# Altium PCB Business_Idea_PCB.PcbDoc
Units mm, origin at the board's own origin, x right, y up, seen from the top; angles counter-clockwise.
Board outline 28 x 44.5 mm, 2 copper layers (Top Layer, Bottom Layer), stack 1.6 mm thick; 51 components, 40 nets, 254 pads, 70 vias.
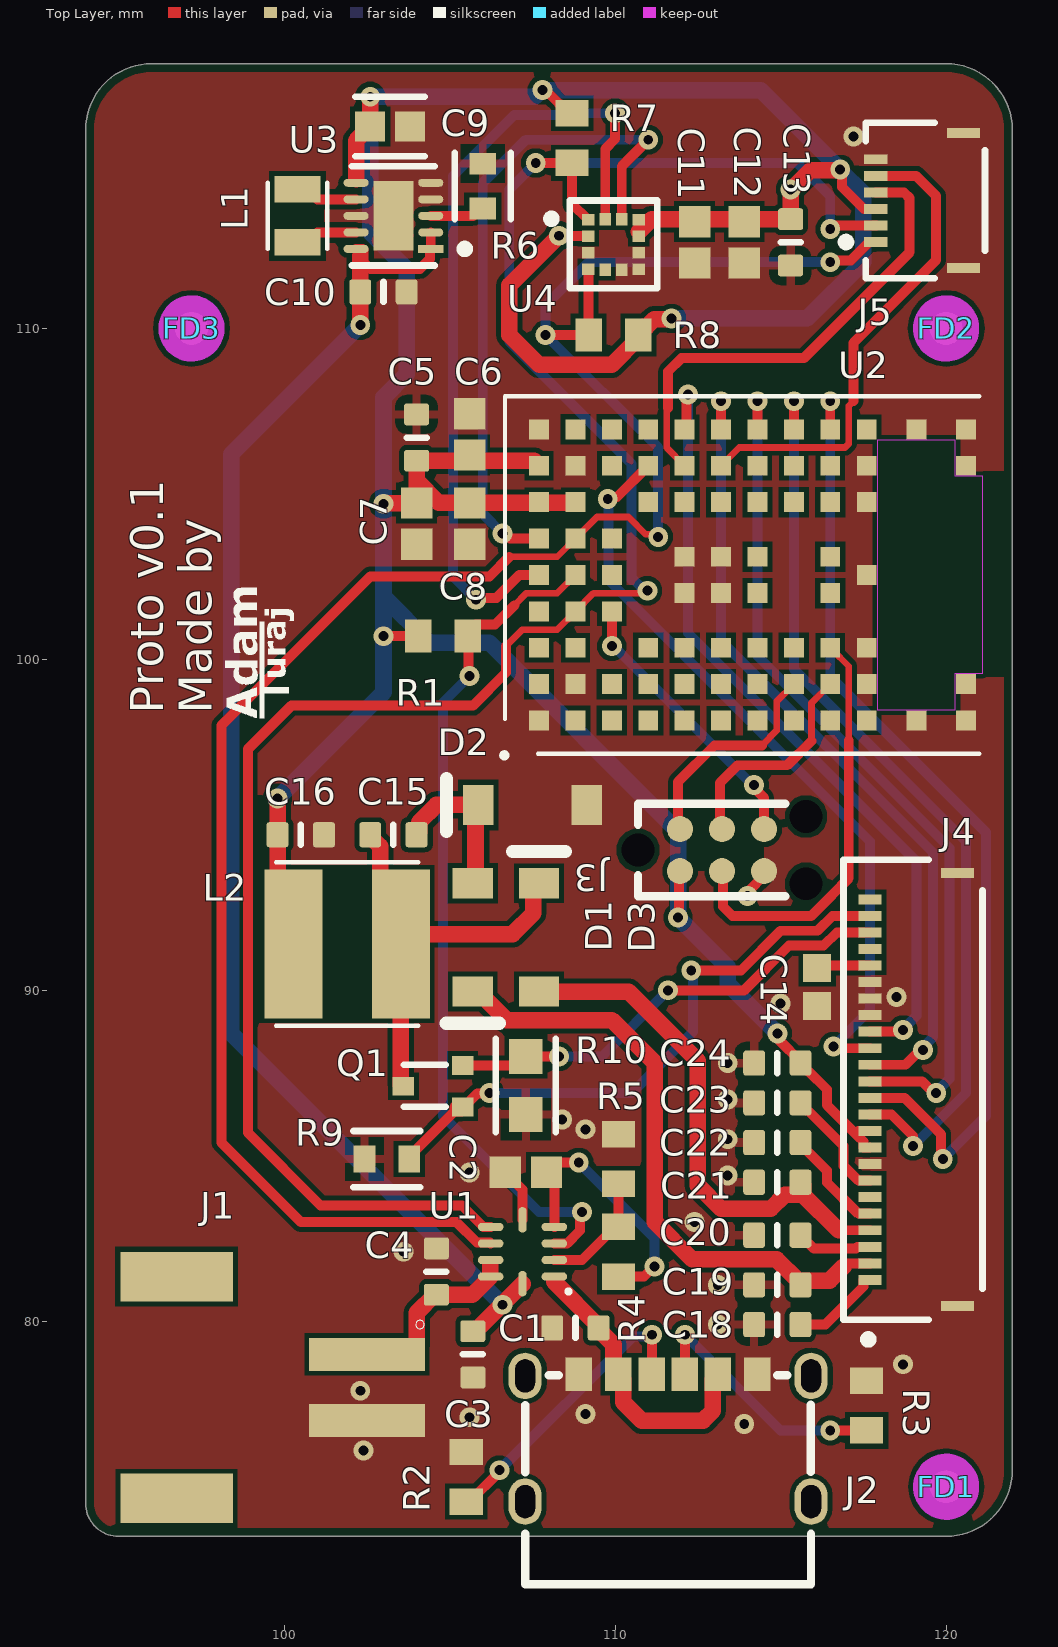
[diagram p0: Top Layer view]
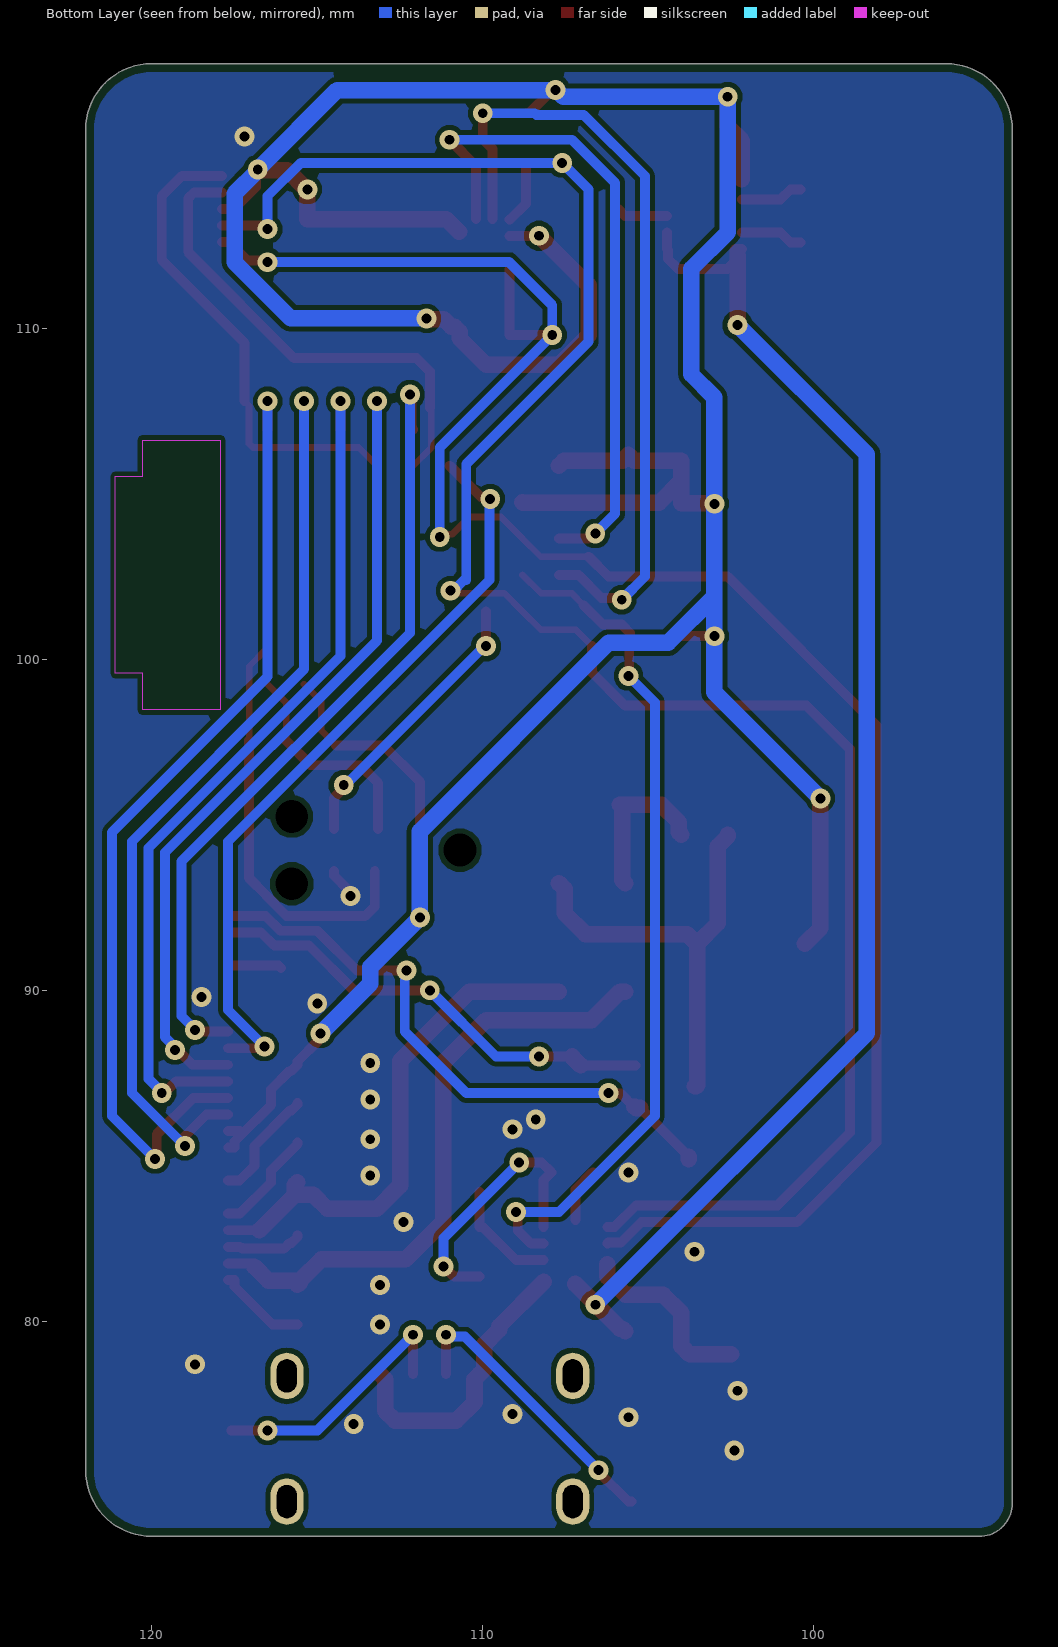
[diagram p1: Bottom Layer view, seen from below]
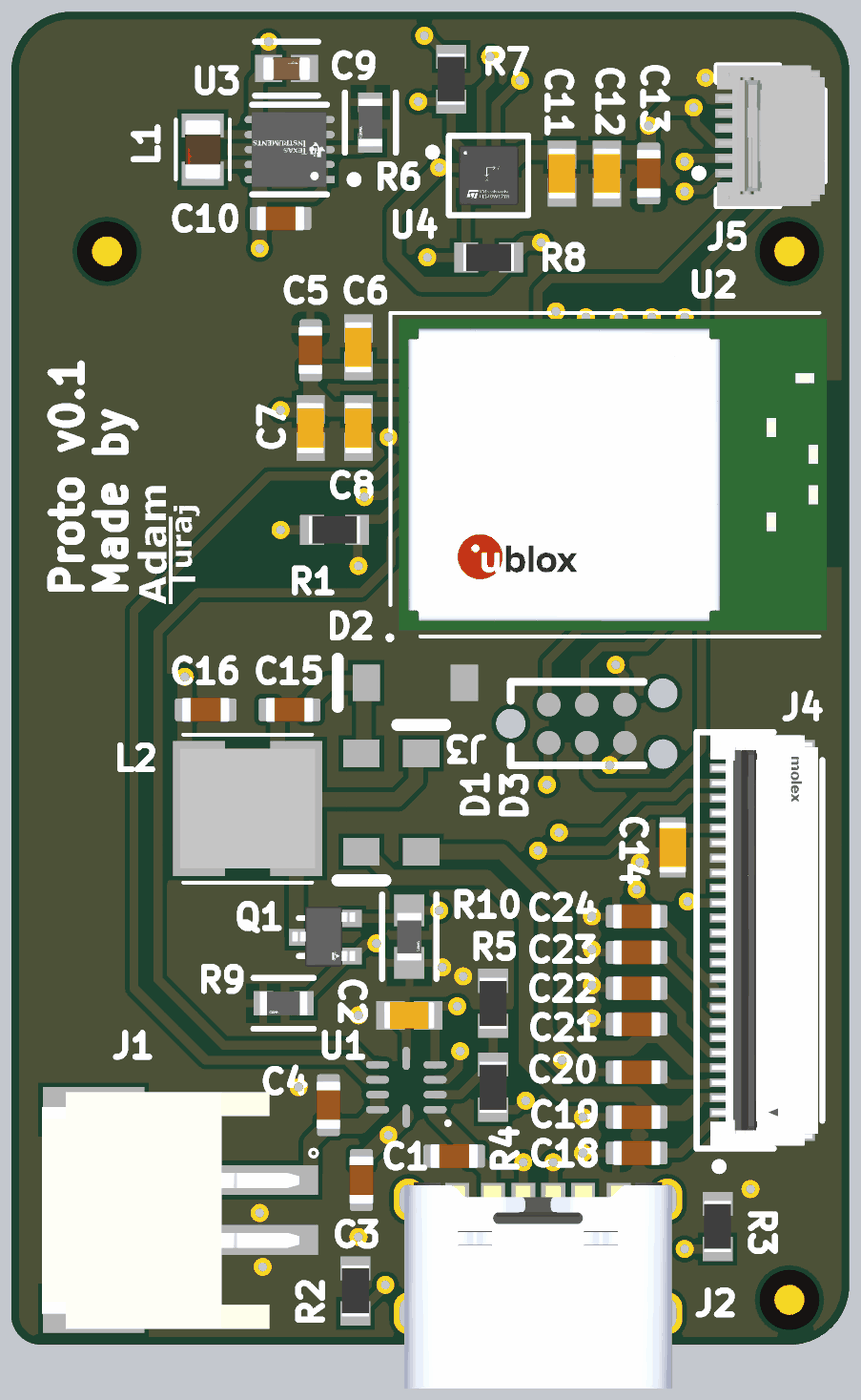
[diagram p2: 3D render of the assembled board from above, using the file's embedded part models]

## Layer stack, top to bottom
Top Solder: solder mask 0.0102, Solder Resist, Dk 3.5
Top Layer: signal copper 0.035
Dielectric 1: prepreg 1.53, PP-006, Dk 4.1
Bottom Layer: signal copper 0.035
Bottom Solder: solder mask 0.0102, Solder Resist, Dk 3.5

## Board outline
94,74.5 ccw(c95,74.5) 95,73.5 120,73.5 ccw(c120,75.5) 122,75.5 122,116 ccw(c120,116) 120,118 96,118 ccw(c96,116) 94,116

## Design rules (kind name [scope] priority, off if disabled: settings)
BoardOutlineClearance [All] p1: gap=0.254 ignorepadtopadclearanceinfootprint=FALSE except(0: Arc-SplitContinuation Track-SplitContinuation SMDPad-SplitContinuation THPad-SplitContinuation Via-SplitContinuation Fill-SplitContinuation Poly-SplitContinuation Region-SplitContinuation Text-SplitContinuation)
Clearance [All] p1: gap=0.15 ignorepadtopadclearanceinfootprint=FALSE except(0.1: Arc-SMDPad Track-SMDPad)
MinimumSolderMaskSliver [All] p1: minsoldermaskwidth=0.1
PlaneClearance [All] p1: clearance=0.102
PlaneConnect PlaneConnectPowerPads [InPadClass('PowerPads')] p1: planeconnectstyle=Direct reliefexpansion=0.508 reliefentries=4 reliefconductorwidth=0.254 reliefairgap=0.254
PlaneConnect [All] p2: pad.planeconnectstyle=Relief pad.reliefexpansion=0.3 pad.reliefentries=4 pad.reliefconductorwidth=0.102 pad.reliefairgap=0.102 via.planeconnectstyle=Direct via.reliefexpansion=0.3 via.reliefentries=4 via.reliefconductorwidth=0.127 via.reliefairgap=0.127
PolygonConnect PolygonConnectException [IsPad And InComponentClass('DirectConnectExceptions')] p1: connectstyle=Direct reliefconductorwidth=0.102 reliefentries=4 polygonreliefangle="90 Angle" airgapwidth=0.102
PolygonConnect PolygonConnectPassives [All vs HasFootprintPad('*0603*','*')] p2: connectstyle=Relief reliefconductorwidth=0.254 reliefentries=4 polygonreliefangle="90 Angle" airgapwidth=0.254
PolygonConnect [All] p3: connectstyle=Direct reliefconductorwidth=0.254 reliefentries=4 polygonreliefangle="90 Angle" airgapwidth=0.254
RoutingVias [All] p1: holewidth=0.711 width=1.27 viastyle="Through Hole" minholewidth=0.711 minwidth=1.27 maxholewidth=0.711 maxwidth=1.27
SolderMaskExpansion [All] p1: expansion=0 istentingtop=FALSE
SupplyNets "Schematic Supply Nets_5" [InNet('3V3')] p1: voltage=0.000
SupplyNets "Schematic Supply Nets_4" [InNet('VDD')] p2: voltage=0.000
SupplyNets "Schematic Supply Nets_3" [InNet('VBUS')] p3: voltage=0.000
SupplyNets "Schematic Supply Nets_2" [InNet('VCC')] p4: voltage=0.000
SupplyNets "Schematic Supply Nets_1" [InNet('VBAT')] p5: voltage=0.000
SupplyNets "Schematic Supply Nets" [InNet('GND')] p6: voltage=0.000
Width [All] p1: maxlimit=10 minlimit=0.154 preferedwidth=0.3 minimp=50.000000 maximp=50.000000 favimp=50.000000
27 further rules are at their usual default settings.

## Classes and differential pairs
component class DirectConnectExceptions: C1 C3 C4 C10 C16
component class Root: FD1 FD2 FD3
component class Power: C9 C10 L1 R6 U3
component class MCU: C5 C6 C7 C8 J3 U2
component class IMU: C11 C12 C13 R7 R8 U4
component class Display: C14 C15 C16 C18 C19 C20 C21 C22 C23 C24 D1 D2 D3 J4 J5 L2 Q1 R9 R10
component class "Battery Charger": C1 C2 C3 C4 J1 J2 R1 R2 R3 R4 R5 U1

## Components (designator, comment, footprint, x,y, rotation, side; value= is the part's Value field where it differs from the comment)
C1 "Capacitor 1µF +/-40% 50V 0603" CAPC0603(1608)100_L 108.8,79.8 r180 top value=1µF
C2 "Capacitor 100 nF +/-10% 50 V 0603" CAPC1608X90X40NL10T20 107.3,84.5 r180 top value=100nF
C3 "Capacitor 10µF +/-20% 10V 0603" CAPC0603(1608)100_L 105.7,79 r270 top value=10µF
C4 "Capacitor 4.7µF +/-20% 10V 0603" CAPC0603(1608)100_L 104.6,81.5 r90 top value=4.7µF
C5 "Capacitor 10µF +/-20% 10V 0603" CAPC0603(1608)100_L 104,106.7 r90 top value=10µF
C6 "Capacitor 100 nF +/-10% 50 V 0603" CAPC1608X90X40NL10T20 105.6,106.8 r90 top value=100nF
C7 "Capacitor 100 nF +/-10% 50 V 0603" CAPC1608X90X40NL10T20 104,104.1 r270 top value=100nF
C8 "Capacitor 100 nF +/-10% 50 V 0603" CAPC1608X90X40NL10T20 105.6,104.1 r270 top value=100nF
C9 "22uF" FP-GRM188-0_2-IPC_C 103.199,116.1 r0 top
C10 "Capacitor 10µF +/-20% 10V 0603" CAPC0603(1608)100_L 103,111.1 r0 top value=10µF
C11 "100nF" CAPC1608X90X40NL10T20 112.4,112.6 r270 top
C12 "100nF" CAPC1608X90X40NL10T20 113.9,112.6 r270 top
C13 "10µF" CAPC0603(1608)100_L 115.3,112.6 r270 top
C14 "1µF" CAPC1608X90X40LL10T20 116.1,90.1 r270 top
C15 "4.7µF" CAPC0603(1608)100_L 103.3,94.7 r0 top
C16 "4.7µF" CAPC0603(1608)100_L 100.5,94.7 r0 top
C18 "Capacitor 1µF +/-0.1% 25V 0603" CAPC0603(1608)100_L 114.9,79.9 r180 top value=1µF
C19 "Capacitor 1µF +/-0.1% 25V 0603" CAPC0603(1608)100_L 114.9,81.1 r180 top value=1µF
C20 "Capacitor 1µF +/-0.1% 25V 0603" CAPC0603(1608)100_L 114.9,82.6 r180 top value=1µF
C21 "Capacitor 1µF +/-0.1% 25V 0603" CAPC0603(1608)100_L 114.9,84.2 r180 top value=1µF
C22 "Capacitor 1µF +/-0.1% 25V 0603" CAPC0603(1608)100_L 114.9,85.4 r180 top value=1µF
C23 "Capacitor 1µF +/-0.1% 25V 0603" CAPC0603(1608)100_L 114.9,86.6 r180 top value=1µF
C24 "Capacitor 1µF +/-0.1% 25V 0603" CAPC0603(1608)100_L 114.9,87.8 r180 top value=1µF
D1 "STPS0530Z" MCC-SOD123_V 105.7,91.6 r270 top
D2 "STPS0530Z" MCC-SOD123_V 107.5,95.6 r180 top
D3 "STPS0530Z" MCC-SOD123_V 107.7,91.6 r90 top
FD1 "FID1X2R" FID1X2R 120,75 r0 top
FD2 "FID1X2R" FID1X2R 120,110 r90 top
FD3 "FID1X2R" FID1X2R 97.2,110 r90 top
J1 "S2B-PH-SM4-TB" JST_S2B-PH-SM4-TB 102.5,78 r90 top
J2 "TYPE-C 6P" "TYPE-C 8P-Footprint-1" 111.6,78.4 r0 top
J3 "Programming Conn" prog-connector-Footprint-1 111.96,93.6 r0 top
J4 "503480-2400" FP-503480-2400-MFG 119,87 r90 top
J5 "503480-0600" MOLX-503480-0600 119.2,113.86 r90 top
L1 "DFE201210U-2R2M=P2" FP-DFE201210U-MFG 100.4,113.4 r270 top value=2.2µH
L2 "SDE0403AT-470K" FP-SDE0403AT-MFG 101.9,91.4 r0 top value=47µH
Q1 "SI1308EDL" FP-5549-IPC_A 105.39,86.478 r180 top
R1 "Resistor 300k +/-1% 0603 100 mW" RESC1608X55X25ML10T15 104.8,100.7 r180 top value=300k
R2 "Resistor 5k1 +/-1% 0603 100 mW" RESC1608X55X25ML10T15 105.5,75.3 r90 top value=5.1k
R3 "Resistor 5k1 +/-1% 0603 100 mW" RESC1608X55X25ML10T15 117.6,77.45 r90 top value=5.1k
R4 "Resistor 10k +/-1% 0603 100 mW" RESC1608X55X25ML10T15 110.1,82.1 r90 top value=10k
R5 "Resistor 10k +/-1% 0603 100 mW" RESC1608X55X25ML10T15 110.1,84.9 r90 top value=10k
R6 "36.5k" FP-AC0603-IPC_C 106,114.3 r270 top
R7 "4.7k" RESC1608X55X25ML10T15 108.7,115.75 r90 top
R8 "4.7k" RESC1608X55X25ML10T15 109.95,109.8 r0 top
R9 "1M" FP-RC0603-0_55-IPC_C 103.1,84.9 r180 top
R10 "2R2" FP-RC0603-0_55-IPC_A 107.3,87.123 r270 top
U1 "MP2664GG" QFN50P200X200X100-10N 107.2,82.1 r180 top
U2 "NORA-B216-00B" NORAB21600B 114.1,102.55 r270 top
U3 "TPS63900DSKR" FP-DSK0010A-IPC_C 103.3,113.4 r180 top
U4 "LIS2DW12TR" FP-LGA12-DM00170568-MFG 109.95,112.537 r0 top

## Footprints (in the part's own frame and the unit in brackets; to place one, negate y for a bottom-side part, rotate by r counter-clockwise, add the part's x,y. Pads: shape width x height; smd on the part's side, far side on the other; paste and mask are expansions set on the pad)
CAPC0603(1608)100_L [mm] "Chip Capacitor, Body 1.6x0.8mm, Height 1.0mm, IPC High Density"
  rrect25% 0.66x0.76 smd: 1(-0.7,0) 2(0.7,0)
  silkscreen extent 0,-0.3 0,0.3, body extent -0.8,-0.4 0.8,0.4, height 0.95
CAPC1608X90X40LL10T20 [mm] "Chip Capacitor, 2-Leads, Body 1.70x0.90mm, IPC High Density"
  rect 0.85x0.85 smd: 1(-0.575,0) 2(0.575,0)
  body extent -0.85,-0.45 0.85,0.45, height 0.9
CAPC1608X90X40NL10T20 [mm] "Chip Capacitor, 2-Leads, Body 1.70x0.90mm, IPC Medium Density"
  rect 0.95x0.95 smd: 1(-0.625,0) 2(0.625,0)
  body extent -0.85,-0.45 0.85,0.45, height 0.9
FID1X2R [mm] "Fiducial - Round 1x2mm"
  round 1 smd paste-0.5 mask+0.5: 0(0,0)
  Top Layer keep-out circle w1: c0,0 r0.5
FP-5549-IPC_A [mm]
  rect 0.648x0.569 smd paste+0 mask+0: 1(0,0) 3(0,-1.255)
  rect 0.648x0.559 smd paste+0 mask+0: 4(1.79,-0.622)
  silkscreen extent 0.51,-1.27 1.78,0, body extent -1.3,-2.15 3.2,0.85, height 0.25
FP-503480-2400-MFG [mm]
  rect 0.3x0.7 smd paste+0 mask+0: 1(5.75,1.3) 2(5.25,1.3) 3(4.75,1.3) 4(4.25,1.3) 5(3.75,1.3) 6(3.25,1.3) 7(2.75,1.3) 8(2.25,1.3) 9(1.75,1.3) 10(1.25,1.3) 11(0.75,1.3) 12(0.25,1.3) 13(-0.25,1.3) 14(-0.75,1.3) 15(-1.25,1.3) 16(-1.75,1.3) 17(-2.25,1.3) 18(-2.75,1.3) 19(-3.25,1.3) 20(-3.75,1.3) 21(-4.25,1.3) 22(-4.75,1.3) 23(-5.25,1.3) 24(-5.75,1.3)
  rect 0.3x1 smd paste+0 mask+0: 25(-6.54,-1.35) 26(6.54,-1.35)
  silkscreen extent -7.67,-2.1 6.95,2.1, body extent -7.05,-2.2 7.05,2.2, height 0.25
FP-AC0603-IPC_C [mm]
  rect 0.659x0.812 smd paste+0 mask+0: 1(-0.677,0) 2(0.677,0)
  silkscreen extent -1.01,-0.85 1.01,0.85, body extent -1.11,-0.55 1.11,0.55, height 0.25
FP-DFE201210U-MFG [mm]
  rect 0.8x1.4 smd: 1(-0.8,0) 2(0.8,0)
  silkscreen extent -1,-0.9 1,0.9, body extent -1.3,-0.8 1.3,0.8, height 0.25
FP-DSK0010A-IPC_C [mm]
  rect 0.756x0.242 smd paste+0 mask+0: 1(-1.128,1)
  rrect100% 0.756x0.242 smd paste+0 mask+0: 2(-1.128,0.5) 3(-1.128,0) 4(-1.128,-0.5) 5(-1.128,-1) 6(1.128,-1) 7(1.128,-0.5) 8(1.128,0) 9(1.128,0.5) 10(1.128,1)
  rect 1.2x2.1 smd paste-1000 mask+0: 11(0,0)
  silkscreen extent -2.28,-1.5 1.25,1.5, body extent -1.61,-1.35 1.61,1.35, height 0.25
FP-GRM188-0_2-IPC_C [mm]
  rect 0.905x0.906 smd paste+0 mask+0: 1(-0.601,0) 2(0.601,0)
  silkscreen extent -1.05,-0.9 1.05,0.9, body extent -1.15,-0.6 1.15,0.6, height 0.25
FP-LGA12-DM00170568-MFG [mm]
  rect 0.375x0.35 smd paste+0 mask+0: 1(-0.763,0.75) 2(-0.763,0.25) 3(-0.763,-0.25) 4(-0.763,-0.75) 7(0.763,-0.75) 8(0.763,-0.25) 9(0.763,0.25) 10(0.763,0.75)
  rect 0.35x0.375 smd paste+0 mask+0: 5(-0.25,-0.763) 6(0.25,-0.763) 11(0.25,0.763) 12(-0.25,0.763)
  silkscreen extent -2,-1.33 1.33,1.33, body extent -1.55,-1.55 1.55,1.55, height 0.25
FP-RC0603-0_55-IPC_A [mm]
  rect 1.059x1.012 smd paste+0 mask+0: 1(-0.877,0) 2(0.877,0)
  silkscreen extent -1.41,-0.91 1.41,0.91, body extent -1.91,-1.01 1.91,1.01, height 0.25
FP-RC0603-0_55-IPC_C [mm]
  rect 0.659x0.812 smd paste+0 mask+0: 1(-0.677,0) 2(0.677,0)
  silkscreen extent -1.01,-0.85 1.01,0.85, body extent -1.11,-0.55 1.11,0.55, height 0.25
FP-SDE0403AT-MFG [mm] "Precision Wire Wound Inductor, 2-Leads, Body 4.50x4.00mm, IPC Medium Density"
  rect 1.75x4.5 smd: 1(-1.625,0) 2(1.625,0)
  silkscreen extent -2.15,-2.47 2.15,2.47, body extent -2.25,-2 2.25,2, height 3.2
JST_S2B-PH-SM4-TB [mm]
  rect 1x3.5 smd: 1(1,0) 2(-1,0)
  rect 1.5x3.4 smd: P1(3.35,5.75) P2(-3.35,5.75)
  silkscreen extent 1.77,-1.73 2.03,-1.47, body extent -3.96,-1.12 3.94,7.48, height 5.5
MCC-SOD123_V [mil] "SOD123, 2-Leads, Body 2.7x1.6mm, Height 1.35mm"
  rect 35.98x47.99 smd: 1(-64.5,0) 2(64.5,0)
  silkscreen extent 102,-31 102,31, body extent -53,-31 53,31, height 53
MOLX-503480-0600 [mm] "FPC Connector, 6-Leads, Right Angle, Pitch 0.5 mm, Mated Height 1.0 mm, SMT"
  rect 0.3x0.7 smd: 1(1.25,1.325) 2(0.75,1.325) 3(0.25,1.325) 4(-0.25,1.325) 5(-0.75,1.325) 6(-1.25,1.325)
  rect 0.3x1 smd: 7(-2.04,-1.325) 8(2.04,-1.325)
  silkscreen extent -2.35,-1.97 2.35,2.35, body extent -2.35,-1.97 2.35,1.63, height 1.91
NORAB21600B [mm]
  rect 0.6x0.6 smd: A1(4.4,-6.4) A2(3.3,-6.4) A3(2.2,-6.4) A4(1.1,-6.4) A5(0,-6.4) A6(-1.1,-6.4) A7(-2.2,-6.4) A8(-3.3,-6.4) A9(-4.4,-6.4) B1(4.4,-5.3) B2(3.3,-5.3) B3(2.2,-5.3) B4(1.1,-5.3) B5(0,-5.3) B6(-1.1,-5.3) B7(-2.2,-5.3) B8(-3.3,-5.3) B9(-4.4,-5.3) C1(4.4,-4.2) C2(3.3,-4.2) C4(1.1,-4.2) C5(0,-4.2) C6(-1.1,-4.2) C8(-3.3,-4.2) C9(-4.4,-4.2) D1(4.4,-3.1) D2(3.3,-3.1) D3(2.2,-3.1) D7(-2.2,-3.1) D8(-3.3,-3.1) D9(-4.4,-3.1) E1(4.4,-2) E2(3.3,-2) E3(2.2,-2) E4(0.55,-2) E5(-0.55,-2) E7(-2.2,-2) E8(-3.3,-2) E9(-4.4,-2) F1(4.4,-0.9) F2(3.3,-0.9) F3(2.2,-0.9) F4(0.55,-0.9) F5(-0.55,-0.9) F7(-2.2,-0.9) F8(-3.3,-0.9) F9(-4.4,-0.9) G1(4.4,0.2) G2(3.3,0.2) G3(2.2,0.2) G4(0.55,0.2) G5(-0.55,0.2) G7(-2.2,0.2) G8(-3.3,0.2) G9(-4.4,0.2) H1(4.4,1.3) H2(3.3,1.3) H3(2.2,1.3) H7(-2.2,1.3) H8(-3.3,1.3) H9(-4.4,1.3) J1(4.4,2.4) J2(3.3,2.4) J3(2.2,2.4) J4(0.55,2.4) J5(-0.55,2.4) J7(-2.2,2.4) J8(-3.3,2.4) J9(-4.4,2.4) K1(4.4,3.5) K2(3.3,3.5) K3(2.2,3.5) K5(0,3.5) K7(-2.2,3.5) K8(-3.3,3.5) K9(-4.4,3.5) L1(4.4,5) L9(-4.4,5) M1(4.4,6.5) M2(3.3,6.5) M8(-3.3,6.5) M9(-4.4,6.5)
  Keep-Out Layer region: -4.075,6.175 -4.075,3.825 4.075,3.825 4.075,6.175 2.975,6.175 2.975,7 -2.975,7 -2.975,6.175
  silkscreen extent -5.4,-7.6 5.6,6.9, body extent -5.2,-7.15 5.2,7.15, height 1.96
prog-connector-Footprint-1 [mil]
  round 30.98 smd paste+0 mask+0: 1(0,0) 2(0,50) 3(50,0) 4(50,50) 5(100,0) 6(100,50)
  round 0 hole 39.02 unplated: 13(-50,25) 13(150,-15) 13(150,65)
  silkscreen extent -50,-30 125,80
QFN50P200X200X100-10N [mm] "QFN, 10-Leads, Body 2.00x2.00mm, Pitch 0.50mm, IPC Medium Density"
  oval 0.775x0.25 smd: 1(-0.962,0.75) 2(-0.962,0.25) 3(-0.962,-0.25) 4(-0.962,-0.75) 6(0.962,-0.75) 7(0.962,-0.25) 8(0.962,0.25) 9(0.962,0.75)
  oval 0.25x0.775 smd: 5(0,-0.962) 10(0,0.962)
  silkscreen extent -1.45,1.14 -1.33,1.26, body extent -1,-1 1,1, height 1
RESC1608X55X25ML10T15 [mm] "Chip Resistor, 2-Leads, Body 1.70x0.90mm, IPC Low Density"
  rect 0.8x1 smd: 1(-0.75,0) 2(0.75,0)
  body extent -0.85,-0.45 0.85,0.45, height 0.55
"TYPE-C 8P-Footprint-1" [mm]
  rect 0.8x1 smd: A5(-0.492,0) A9(1.5,0) A12(2.7,0) B5(0.508,0) B9(-1.5,0) B12(-2.7,0)
  oval 1x1.4 hole 0.6 slot 1 at 90 deg: SH1(-4.32,-0.05) SH2(4.32,-0.05) SH3(4.32,-3.85) SH4(-4.32,-3.85)
  silkscreen extent -4.32,-6.35 4.32,-0.03, body extent -4.47,-6.37 4.47,0.53, height 3.27

## Part data
C1: library part CMP-001-00078-4, "Chip Capacitor, 1µF +/-40%, 50V, 0603, Thickness 1 mm", Case/Package=0603, Max Operating Temperature=85°C, Min Operating Temperature=-55°C, Tolerance=10%, Voltage Rating=50V, Mounting Technology=SMT, Pins=2
C2 C6 C7 C8 C11 C12: library part CMP-001-00017-6, "Chip Capacitor, 100 nF, +/- 10%, 50 V, 0603 (1608 Metric)", Capacitor Type=Ceramic, Case/Package=0603, Max Operating Temperature=125°C, Min Operating Temperature=-55°C, Tolerance=10%, Voltage Rating=50V, Mounting Technology=SM, Pins=2, RoHS Compliant=True
C3 C5 C10 C13: library part CMP-001-00075-4, "Chip Capacitor, 10µF +/-20%, 10V, 0603, Thickness 1 mm", Case/Package=0603, Max Operating Temperature=85°C, Min Operating Temperature=-55°C, Tolerance=10%, Voltage Rating=10V, Mounting Technology=SMT, Pins=2
C4 C16: library part CMP-001-00076-4, "Chip Capacitor, 4.7µF +/-20%, 10V, 0603, Thickness 1 mm", Case/Package=0603, Max Operating Temperature=85°C, Min Operating Temperature=-55°C, Tolerance=10%, Voltage Rating=10V, Mounting Technology=SMT, Pins=2
C9: library part CMP-2000-06337-3, "Chip Multilayer Ceramic Capacitors for General Purpose, 0603, 22uF, X5R, 15%, 20%, 10V", Case Code (Imperial)=0603, Case Code (Metric)=1608, Dielectric=X5R, Max Operating Temperature=85°C, Min Operating Temperature=-55°C, Package Quantity=4000, Tolerance=20%, Voltage Rating=10V, Capacitance=22uF, Case/Package=0603, Depth=0.8mm, Height=0.8mm, Lead Free="Lead Free", Length=1.6mm, Material=Ceramic, Mount="Surface Mount", Packaging="Tape and Reel", REACH SVHC="No SVHC", Termination=SMD/SMT, Thickness=0.039inch, Voltage Rating (DC)=10V, Weight=0.000222oz, Width=0.8mm
C14: library part CMP-001-00005-6, "Chip Capacitor, 1 uF, +/- 10%, 25 V, 0603 (1608 Metric)", Capacitor Type=Ceramic, Case/Package=0603, Max Operating Temperature=125°C, Min Operating Temperature=-55°C, Tolerance=10%, Voltage Rating=25V, Mounting Technology=SM, Pins=2, RoHS Compliant=True
C15: library part CMP-001-00076-4, "Chip Capacitor, 4.7µF +/-20%, 25V, 0603, Thickness 1 mm", Case/Package=0603, Max Operating Temperature=85°C, Min Operating Temperature=-55°C, Tolerance=10%, Voltage Rating=25V, Mounting Technology=SMT, Pins=2
C18 C19 C20 C21 C22 C23 C24: library part CMP-001-00055-4, "Chip Capacitor, 1µF +/-0.1%, 25V, 0603, Thickness 1 mm", Case/Package=0603, Max Operating Temperature=85°C, Min Operating Temperature=-55°C, Tolerance=20%, Voltage Rating=25V, Mounting Technology=SMT, Pins=2
D1 D2 D3: library part CMP-004-00031-1, "SCHOTTKY RECTIFIER Rectifier Diode, Schottky, 1 Phase, 1 Element, 0.5A, 30V V(RRM), Silicon", Forward Current=500mA, Forward Voltage=220mV, Max Operating Temperature=150°C, Max Surge Current=5.5A, Min Operating Temperature=-40°C, Mounting Technology="Surface Mount", Pins=2
FD1 FD2 FD3: library part CMP-00028-00005-2, "Fiducial - Round 1x2mm", Pins=0
J1: library part CMP-002-00072-3, "Connector Header Surface Mount, Right Angle 2 position 0.079 (2.00mm)", Case/Package=None, Check_prices=https://www.snapeda.com/parts/S2B-PH-SM4-TB/JST/view-part/?ref=eda, Component Type=Standard, Design Item ID=S2B-PH-SM4-TB, MF="JST Sales", MP=S2B-PH-SM4-TB, Pins=2, SnapEDA_Link=https://www.snapeda.com/parts/S2B-PH-SM4-TB/JST/view-part/?ref=snap, Source=S2B-PH-SM4-TB.SchLib
J2: library part CMP-002-00074-2, "6P Black Female Surface Mount, Right Angle USB Type-C", Case/Package=SMD, Max Current Rating=3A, Max Operating Temperature=80°C, Min Operating Temperature=-30°C, Voltage Rating=5V, Connector Type=USB, Gender=Female, Mounting Technology="Right Angle", Pins=6
J3: library part CMP-002-00075-2, "Custom TC2030-NL based connector for programming"
J4: library part CMP-002-00076-1, "Molex 503480-2400 FFC & FPC Connectors, 0.5mm, FPC Ra Smt Dual Cont 24 Circuit,", Max Operating Temperature=105°C, Min Operating Temperature=-40°C, Voltage Rating=50V, Gender=Female, Mounting Technology="Surface Mount", Pins=24
J5: library part CMP-002-00077-1, "FFC and FPC Connectors; MOLEX; 503480-0600; Gold; Surface Mount; 500 mA; 6", Max Operating Temperature=105°C, Min Operating Temperature=-40°C, Voltage Rating=50V, Gender=Female, Mounting Technology="Surface Mount", Pins=6
L1: library part CMP-006-00025-2, "Inductor Power Shielded Wirewound 2.2uH 20% 1MHz Metal 1.2A 0.228Ohm DCR 0805 T/R", Case/Package=0805, Current Rating=1.2A, Max Operating Temperature=125°C, Min Operating Temperature=-40°C, Self Resonant Frequency=80MHz, Tolerance=20%, Max Current Rating=1.2A, Mounting Technology="Surface Mount"
L2: library part CMP-006-00026-2, "Inductor Power Unshielded Wirewound 47uH 10% 1MHz Ferrite 0.5A 0.631Ohm DCR Automotive AEC-Q200", Case/Package=1816, Max Current Rating=500mA, Max Operating Temperature=150°C, Min Operating Temperature=-55°C, Self Resonant Frequency=16MHz, Tolerance=10%
Q1: library part CMP-013-00034-1, "SI1308EDL-T1-GE3 N-channel Mosfet Transistor, 1.5 A, 30 V, 3-PIN SC-70", Case/Package=SOT-323, Max Operating Temperature=150°C, Min Operating Temperature=-55°C, Mounting Technology="Surface Mount", Pins=3
R1: library part CMP-009-00178-1, "Chip Resistor, 300 KOhm, +/- 1%, 0.1 W, -55 to 155 degC, 0603 (1608 Metric)", Case/Package=0603, Max Operating Temperature=155°C, Min Operating Temperature=-55°C, Power=100mW, Tolerance=1%, Voltage Rating=50V, Mounting Technology=SM, Pins=2, RoHS Compliant=True
R2 R3: library part CMP-009-00183-1, "Chip Resistor, 5.1 KOhm, +/- 1%, 0.1 W, -55 to 155 degC, 0603 (1608 Metric)", Case/Package=0603, Max Operating Temperature=155°C, Min Operating Temperature=-55°C, Power=100mW, Tolerance=1%, Voltage Rating=50V, Mounting Technology=SM, Pins=2, RoHS Compliant=True
R4 R5: library part CMP-009-00017-5, "Chip Resistor, 10 KOhm, +/- 1%, 01 W, -55 to 155 degC, 0603 (1608 Metric)", Case/Package=0603, Max Operating Temperature=155°C, Min Operating Temperature=-55°C, Power=100mW, Tolerance=1%, Voltage Rating=50V, Mounting Technology=SM, Pins=2, RoHS Compliant=True
R6: library part CMP-03412-047799-1, "RES 36.5KΩ 0.50% 0.1W 0603", RoHS Compliant=Yes
R7 R8: library part CMP-009-00031-5, "Chip Resistor, 4.7 KOhm, +/- 1%, 0.1 W, -55 to 155 degC, 0603 (1608 Metric)", Case/Package=0603, Max Operating Temperature=155°C, Min Operating Temperature=-55°C, Power=100mW, Tolerance=1%, Mounting Technology=SM, Pins=2, RoHS Compliant=True
R9: library part CMP-2000-06953-2, "RES SMD 1M OHM 5% 1/10W 0603", Case Code (Imperial)=0603, Case Code (Metric)=1608, Max Operating Temperature=155°C, Max Power Dissipation=100mW, Min Operating Temperature=-55°C, Package Quantity=5000, Resistance=1MR, Resistance Tolerance=5%, Resistor Type="Thick Film", Temperature Coefficient=100ppm/°C, Voltage Rating=50V, Case/Package=0603, Construction=Rectangular, Contact Plating=Tin, Depth=0.8mm, Features="Moisture Resistant", Height=0.45mm, Lead Free="Lead Free", Length=1.6mm, Military Standard=Not, Number of Pins=2, Number of Terminations=2, Packaging="Tape and Reel", Power Rating=100mW, Radiation Hardening=No, REACH SVHC="No SVHC", RoHS Compliant=Yes, SERIES=RC, Size Code=0603, Termination=SMD/SMT, Tolerance=5%, Voltage Rating (DC)=50V, Width=0.8mm
R10: library part CMP-03412-037810-1, "RES SMD 2.2 OHM 1% 1/10W 0603", Case Code (Imperial)=0603, Case Code (Metric)=1608, Max Operating Temperature=155°C, Max Power Dissipation=100mW, Min Operating Temperature=-55°C, Package Quantity=1, Resistance=2.2R, Resistance Tolerance=1%, Resistor Type="Thick Film", Temperature Coefficient=200ppm/°C, Voltage Rating=50V, Case/Package=0603, Depth=0.8mm, Features="Moisture Resistant", Height=0.022inch, Lead Free="Lead Free", Length=0.063inch, Number of Pins=2, Number of Terminations=2, Packaging="Tape and Reel", Power Rating=100mW, REACH SVHC="No SVHC", RoHS Compliant=Yes, SERIES=RC, Size Code=0603, Technology="THICK FILM", Termination=SMD/SMT, Tolerance=1%, Voltage Rating (DC)=50V, Width=0.031inch
U1: library part CMP-00029-00001-2, "Battery Management 500mA 5V USB I2C Controlled Battery Charger", Case/Package=None, Check_prices=https://www.snapeda.com/parts/MP2664GG-0000-Z/Monolithic+Power+Systems/view-part/?ref=eda, Component Type=Standard, Design Item ID=MP2664GG-0000-Z, MF="Monolithic Power Systems (MPS)", MP=MP2664GG-0000-Z, Pins=10, SnapEDA_Link=https://www.snapeda.com/parts/MP2664GG-0000-Z/Monolithic+Power+Systems/view-part/?ref=snap, Source=MP2664GG-0000-Z.SchLib
U2: library part CMP-403-000000-3, "Bluetooth Modules - 802.15.1 Bluetooth LE module, (open CPU), pcb antenna, nRF54L10 chip", Manufacturer_Name=u-blox, Arrow Part Number=NORA-B216-00B, Arrow Price/Stock=https://www.arrow.com/en/products/nora-b216-00b/u-blox.html?utm_currency=USD&region=nac, Datasheet Link=https://content.u-blox.com/sites/default/files/documents/NORA-B2_DataSheet_UBXDOC-1023859458-38975.pdf, Design Item ID=NORA-B216-00B, Geometry.Height=2mm, Manufacturer_Part_Number=NORA-B216-00B, Source=NORA-B216-00B.SchLib
U3: library part CMP-04918-000700-1, "1.8-V TO 5.5-V, 75-NA IQ BUCK-BO", RoHS Compliant=Yes
U4: library part CMP-12175-000006-1, "ACCEL 2-16G I2C/SPI 12LGA", Manufacturer=STMicroelectronics, Max Supply Voltage=3.6V, Min Supply Voltage=1.62V, Operating Supply Current=0.38-90uA, Package=LGA12-DM00170568, Temperature="-40°C to +85°C", Temperature Range High=+85°C, Temperature Range Low=-40°C, Accel Range=2/4/8/16g, Accel Resolution=14bits, Automotive=No, Category=IC, ComponentLink2Description=Datasheet, ComponentLink2URL=https://www.st.com/resource/en/datasheet/lis2dw12.pdf, Device Class L1=Sensors, Device Class L2="Motion Sensors", Device Class L3=Accelerometers, Digikey Description="ACCEL 2-16G I2C/SPI 12LGA", Footprint Url=https://www.st.com/content/ccc/resource/technical/document/technical_note/73/17/9c/16/dd/96/4a/01/CD00134799.pdf/files/CD00134799.pdf/jcr:content/translations/en.CD00134799.pdf, Height=0.7mm, Lead Free=Yes, Manufacturer Part Number=LIS2DW12TR, Mouser Description="Accelerometer Triple ±2g/±4g/±8g/±16g 1.62V to 3.6V 0.244mg/digit/0.488mg/digit/0.976mg/digit/1.952mg/digit 12-Pin LG...", Octopart=https://octopart.com/lis2dw12tr-stmicroelectronics-77080925, RoHS=TRUE, Sensor Output=I2C,SPI

## Via types
v1: diameter 0.6, hole 0.3, Top Layer to Bottom Layer, 70 vias

## Nets (pads, with @x,y where several pads share a name; then routed paths per layer and width w, separated by ;. In a path a pad name is that pad's centre, name@x,y a point inside that pad or via, vN(x,y) a via of type N, cw(c..) or ccw(c..) an arc to the next point about the centre after c; other vN are vias at no path point)
3V3: C5.1 C6.1 C7.1 C8.1 C9.1 C11.1 C12.1 C13.1 C16.1 C24.1 J3.1 J4.15 J4.16 J5.4 L2.1 R1.2 R7.2 R8.2 U2.A7 U2.A8 U2.B7 U3.6 U4.2 U4.9 U4.10 | length 114.4
  Top Layer w0.3: v1(103,100.7) R1.2 ; v1(107.8,117.2) 107.857,117.143 107.957,117.143 108.6,116.5 R7.2 ; v1(108.3,112.8) 108.306,112.794 109.181,112.794 U4.2 ; v1(111.9,92.2) 111.93,92.23 111.93,93.57 J3.1 ; v1(114.9,88.7) 114.957,88.643 114.957,88.492 115.6,87.85 115.6,87.75 115.78,87.57 115.83,87.57 116.4,87 116.4,86.529 117.346,85.583 ; v1(116.8,114.8) 116.857,114.743 116.857,114.274 117.521,113.61 J5.4 ; J4.16@117.679,85.25 117.5,85.25 117.5,85.429 117.346,85.583 ; J4.15 117.346,85.75 117.346,85.583
  Top Layer w0.5: v1(99.8,95.8) C16.1 99.8,91.875 L2.1 ; U3.6@102.172,114.503 102.172,115.673 C9.1 v1@102.599,116.999 ; v1(103,104.7) 103.012,104.712 C7.1@104,104.712 ; C7.1 C5.1 105.425,106 C6.1 105.775,106 107.55,106 U2.A8 ; 104,105.4 104.668,104.732 105.593,104.732 C8.1 105.612,104.737 108.788,104.737 U2.B7 ; v1(108.3,112.8) 106.8,111.3 106.8,109.8 107.7,108.9 109.9,108.9 110.7,109.7 R8.2 ; R8.2@110.7,109.9 110.85,110.05 110.95,110.05 111.181,110.281 111.681,110.281 v1(111.7,110.3) ; U4.9@110.719,112.919 111.1,113.3 C13.1 v1(115.3,114.2) 115.327,114.2 115.908,114.781 116.781,114.781 v1(116.8,114.8)
  Bottom Layer w0.5: v1(99.8,95.8) 103,99 v1(103,100.7) 103,101.9 ; v1(111.7,110.3) 115.8,110.3 117.5,112 117.5,114.073 116.8,114.773 v1(116.8,114.8) 114.4,117.2 v1(107.8,117.2) 107.773,117.2 107.573,117 v1(102.6,117) 102.6,112.9 103.7,111.8 103.7,108.614 103,107.914 v1(103,104.7) 103,101.9 ; v1(114.9,88.7) 113.396,90.204 113.396,90.704 v1(111.9,92.2) 111.9,94.8 106.2,100.5 104.4,100.5 103,101.9
CHARGER_INT: R1.1 U1.3 U2.B5 | length 25.9
  Top Layer w0.2: 106.954,101.635 107.319,102 108.25,102 U2.B5
  Top Layer w0.3: v1(105.6,99.5) 105.575,99.525 105.575,100.675 R1.1 105.55,100.8 105.8,101.05 106.369,101.05 106.954,101.635 ; U1.3 108.55,82.35 108.943,82.743 108.943,83.243 v1(109,83.3)
  Bottom Layer w0.3: v1(105.6,99.5) 104.8,98.7 104.8,86.2 107.7,83.3 v1(109,83.3)
DISPLAY_BUSY: J4.9 U2.E9 | length 24.3
  Top Layer w0.3: U2.E9 112.15,107 112.15,107.95 v1(112.2,108) ; J4.9 118.65,88.75 v1(118.7,88.8)
  Bottom Layer w0.3: v1(112.2,108) 112.2,100.8 119.1,93.9 119.1,89.226 118.7,88.826 v1(118.7,88.8)
DISPLAY_CS: J4.12 U2.G9 | length 26.5
  Top Layer w0.3: U2.G9 v1(114.3,107.8) ; J4.12 119.269,87.25 119.619,86.9 v1(119.7,86.9)
  Bottom Layer w0.3: v1(114.3,107.8) 114.3,100.1 120.1,94.3 120.1,87.326 119.7,86.926 v1(119.7,86.9)
DISPLAY_DC: J4.11 U2.F9 | length 25
  Top Layer w0.3: U2.F9 v1(113.2,107.8) ; J4.11 118.769,87.75 119.219,88.2 v1(119.3,88.2)
  Bottom Layer w0.3: v1(113.2,107.8) 113.2,100.564 119.6,94.164 119.6,88.581 119.3,88.281 v1(119.3,88.2)
DISPLAY_MOSI: J4.14 U2.H9 | length 28
  Top Layer w0.3: U2.H9 v1(115.4,107.8) ; J4.14 118.35,86.25 119,85.6 v1(119,85.3)
  Bottom Layer w0.3: v1(115.4,107.8) 115.4,99.7 120.6,94.5 120.6,86.9 v1(119,85.3)
DISPLAY_RESET: J4.10 U2.D8 | length 23
  Top Layer w0.3: v1(109.776,104.85) 109.833,104.907 110.057,104.907 U2.D8 ; v1(116.6,88.3) 116.65,88.25 J4.10
  Bottom Layer w0.3: v1(109.776,104.85) 109.8,104.826 109.8,102.4 117.7,94.5 117.7,89.4 v1(116.6,88.3)
DISPLAY_SCK: J4.13 U2.J9 | length 29.6
  Top Layer w0.3: U2.J9 v1(116.5,107.8) ; J4.13 118.75,86.75 119.85,85.65 119.85,84.95 v1(119.9,84.9)
  Bottom Layer w0.3: v1(116.5,107.8) 116.5,99.476 121.2,94.776 121.2,86.2 v1(119.9,84.9)
GDR: J4.2 Q1.1 R9.1 | length 18.2
  Top Layer w0.3: R9.1@103.777,84.977 Q1.1@105.243,86.443 ; Q1.1@105.429,86.478 105.832,86.881 v1@106.181,86.881 ; v1(112.3,90.6) 113.8,90.6 115,91.8 116.112,91.8 116.562,92.25 J4.2
  Top Layer w0.5: R9.1 R9.1@103.777,84.977 ; Q1.1@105.243,86.443 105.355,86.443 Q1.1 Q1.1@105.429,86.478 ; v1@106.181,86.881 v1(106.2,86.9)
  Bottom Layer w0.3: v1(106.2,86.9) 110.5,86.9 112.357,88.757 112.357,90.543 v1(112.3,90.6)
GND: C1.2 C2.2 C3.2 C4.2 C5.2 C6.2 C7.2 C8.2 C9.2 C10.2 C11.2 C12.2 C13.2 C14.2 C16.2 C18.2 C19.2 C20.2 C21.2 C22.2 C23.2 C24.2 D2.1 J1.2 J2.A12 J2.B12 J3.5 J4.6 J4.7 J4.8 J4.17 J4.25 J4.26 J5.1 J5.7 J5.8 R2.2 R3.2 R5.2 R6.1 R9.2 R10.2 U1.5 U2.A1 U2.A9 U2.B2 U2.B8 U2.E4 U2.E5 U2.F4 U2.F5 U2.K2 U2.K3 U2.K5 U2.K7 U2.K8 U2.L1 U2.L9 U2.M1 U2.M2 U2.M8 U2.M9 U3.4 U3.5 U3.8 U3.11 U4.3 U4.6 U4.7 U4.8 | length 2.6
  Top Layer w0.3: C2.2 107.2,83.975 U1.5 ; v1(114,92.85) 114.057,92.907 114.057,93.026 114.5,93.468 J3.5
  other v1: 102.4,76.1 113.9,76.9 105.6,77.1 109.1,77.2 102.3,77.9 118.7,78.7 113.1,79.9 113.1,81.1 103.6,82.1 112.4,83 113.4,84.4 105.6,84.5 113.4,85.5 109.1,85.8 108.4,86.1 113.4,86.7 113.4,87.8 115,89.6 118.5,89.8 117.2,115.8
IMU_INT1: U2.A5 U4.12 | length 24.3
  Top Layer w0.3: v1(105.8,101.8) 105.857,101.857 106.409,101.857 107.101,102.55 U2.A5 ; U4.12 109.7,115.419 110,115.719 v1(110,116.5)
  Bottom Layer w0.3: v1(105.8,101.8) 105.1,102.5 105.1,114.6 106.95,116.45 108.381,116.45 108.431,116.5 v1(110,116.5)
IMU_INT2: U2.A6 U4.11 | length 20.3
  Top Layer w0.3: v1(106.6,103.8) 106.681,103.8 106.826,103.655 107.695,103.655 U2.A6 ; U4.11 110.2,114.9 v1(111,115.7)
  Bottom Layer w0.3: v1(106.6,103.8) 106,104.4 106,114.4 107.3,115.7 v1(111,115.7)
NetC14_1: C14.1 J4.5 | length 1.6
  Top Layer w0.3: C14.1 116.175,90.75 J4.5
NetC15_1: C15.1 D3.2 L2.2 Q1.4 | length 13.4
  Top Layer w0.5: C15.1 102.6,94.65 102.9,94.35 102.9,92.025 L2.2 ; Q1.4 103.556,87.1 103.525,87.131 L2.2 ; D3.2 107.524,93.062 107.524,92.324 106.9,91.7 103.825,91.7 L2.2
NetC15_2: C15.2 D1.1 D2.2 | length 4.8
  Top Layer w0.5: C15.2 104.08,94.78 104.08,95.08 104.6,95.6 D2.2 105.781,95.519 105.781,93.319 D1.1
NetC18_1: C18.1 J4.24 | length 2.8
  Top Layer w0.3: C18.1 116.35,79.9 117.5,81.05 117.5,81.25 J4.24
NetC20_1: C20.1 J4.22 | length 2.3
  Top Layer w0.3: C20.1 115.6,82.55 115.78,82.37 115.83,82.37 116,82.2 117.278,82.2 117.328,82.25 J4.22
NetC22_1: C22.1 J4.20 | length 3.2
  Top Layer w0.3: C22.1 115.6,85.35 116.4,84.55 116.4,84.196 117.346,83.25 J4.20
NetC23_1: C23.1 J4.18 | length 3.5
  Top Layer w0.3: C23.1 115.6,86.55 115.78,86.37 115.83,86.37 116.9,85.3 116.9,84.696 117.346,84.25 J4.18
NetJ2_A5: J2.A5 R2.1 | length 8.9
  Top Layer w0.3: R2.1 105.6,74.55 106.5,75.45 v1(106.5,75.5) ; v1@111.1,79.6 v1(111.108,79.592) J2.A5
  Bottom Layer w0.3: v1(106.5,75.5) 110.535,79.535 111.051,79.535 v1(111.108,79.592)
NetJ2_B5: J2.B5 R3.1 | length 7.9
  Top Layer w0.3: v1@112.1,79.6 v1(112.108,79.592) J2.B5 ; v1(116.5,76.7) R3.1
  Bottom Layer w0.3: v1(112.108,79.592) 115,76.7 v1(116.5,76.7)
NetL1_1: L1.1 U3.7 | length 1.9
  Top Layer w0.3: L1.1 100.7,114.2 101,113.9 U3.7
NetL1_2: L1.2 U3.9 | length 1.9
  Top Layer w0.3: L1.2 100.7,112.6 101,112.9 U3.9
NetR4_2: R4.2 R5.1 U1.2 | length 3.4
  Top Layer w0.3: U1.2 109,81.85 110,82.85 R4.2 R5.1@110.1,83.9
NetR6_2: R6.2 U3.3 | length 1.7
  Top Layer w0.3: U3.3 105.7,113.4 105.923,113.623 R6.2
nRESET: J3.3 U2.J3 | length 12.6
  Top Layer w0.2: U2.J3@116.565,100.285 117.057,99.793 117.057,97.543
  Top Layer w0.3: J3.3@113.263,93.6 113.263,92.537 113.55,92.25 115.926,92.25 116.565,92.889 116.565,92.896 117.057,93.388 117.057,97.543
PREVGH: C21.1 D3.1 J4.21 | length 16
  Top Layer w0.3: 116.75,82.75 J4.21
  Top Layer w0.5: D3.1 110.406,89.962 112.5,87.867 112.5,84.1 113.2,83.4 114.7,83.4 115.12,83.82 115.68,83.82 ; C21.1 115.68,84.12 115.68,83.82 ; 116.75,82.75 115.68,83.82
PREVGL: C19.1 D1.2 J4.23 | length 18.8
  Top Layer w0.3: 116.9,81.65 117,81.75 J4.23
  Top Layer w0.5: D1.2 105.852,89.962 106.714,89.1 109.9,89.1 111.2,87.8 111.2,83 112.33,81.87 114.88,81.87 115.52,81.23 115.52,81.18 C19.1 ; C19.1@115.6,81.15 115.68,81.23 116.48,81.23 116.9,81.65
RESE: J4.3 Q1.3 R10.1 | length 14
  Top Layer w0.3: Q1.3 R10.1@107.044,87.733 ; R10.1 v1(108.3,88) ; v1(111.6,90) 113.9,90 115.25,91.35 116.299,91.35 116.699,91.75 J4.3
  Top Layer w0.5: R10.1@107.044,87.733 107.3,87.989 R10.1
  Bottom Layer w0.3: v1(108.3,88) 109.6,88 v1(111.6,90)
SCL: J5.5 R7.1 U1.6 U2.B4 U4.1 | length 64.5
  Top Layer w0.2: 106.7,100.4 107.2,100.9 108.25,100.9 U2.B4 109.35,102 110.9,102 v1(110.974,102.074)
  Top Layer w0.3: U1.6 106.025,82.85 105.375,83.5 101.1,83.5 98.9,85.7 98.9,97.285 100.215,98.6 105.7,98.6 106.7,99.6 106.7,100.4 ; v1(107.6,115) R7.1 108.7,113.762 109.175,113.288 U4.1 ; v1(116.5,113) 116.581,113 116.691,113.11 J5.5
  Bottom Layer w0.3: v1(110.974,102.074) 110.893,102.074 110.567,102.4 110.5,102.4 110.5,105.9 106.8,109.6 106.8,114.2 v1(107.6,115) 115.5,115 116.5,114 v1(116.5,113)
SDA: J5.6 R8.1 U1.7 U2.B6 U4.4 | length 60.6
  Top Layer w0.2: 106.8,103.1 108.25,103.1 U2.B6@108.85,103.7 ; U2.B6 109.45,104.3 110.4,104.3 110.926,103.774 111.226,103.774 v1(111.3,103.7)
  Top Layer w0.3: U1.7 106.213,82.375 105.825,82.375 105.2,83 100.5,83 98.1,85.4 98.1,98 102.6,102.5 106.2,102.5 106.8,103.1 ; v1(107.9,109.8) R8.1 109.194,109.806 109.194,111.781 U4.4 ; v1(116.5,112) 116.557,112.057 117.122,112.057 117.675,112.61 J5.6
  Bottom Layer w0.3: v1(111.3,103.7) 111.3,106.4 v1(107.9,109.8) 107.9,110.7 109.2,112 v1(116.5,112)
SWDCLK: J3.4 U2.J2 | length 6.6
  Top Layer w0.2: 115.932,97.532 115.932,98.682 U2.J2
  Top Layer w0.3: J3.4@113.17,94.87 113.17,96.27 113.7,96.8 115.2,96.8 115.932,97.532
SWDIO: J3.2 U2.H2 | length 6.7
  Top Layer w0.2: 114.433,97.4 114.879,97.847 114.879,98.729 U2.H2
  Top Layer w0.3: J3.2@111.9,94.87 111.9,96.3 113,97.4 114.433,97.4
SWO: J3.6 U2.C4 | length 8.5
  Top Layer w0.3: v1(109.9,100.4) U2.C4 ; v1(114.2,96.2) 114.2,96.119 114.5,95.819 J3.6
  Bottom Layer w0.3: v1(109.9,100.4) 109.95,100.4 114.15,96.2 v1(114.2,96.2)
TOUCH_INT: J5.2 U2.F8 | length 14.8
  Top Layer w0.2: U2.F8 113.75,106.4 116.945,106.4 117.062,106.517 117.062,107.662 117.2,107.8
  Top Layer w0.3: 117.2,107.8 117.2,109.564 119.7,112.064 119.7,114 119.09,114.61 J5.2
TOUCH_RESET: J5.3 U2.E8 | length 14.6
  Top Layer w0.154: 111.562,107.562 111.6,107.6
  Top Layer w0.2: 111.562,107.562 111.562,106.388 U2.E8
  Top Layer w0.3: 111.6,107.6 111.6,108.7 112,109.1 115.7,109.1 118.9,112.3 118.9,113.934 118.724,114.11 J5.3
VBAT: C4.1 J1.1 U1.8 U1.9 | length 5.7
  Top Layer w0.5: J1.1 103.75,79 104,79.25 104,80.25 104.55,80.8 C4.1 105.687,80.8 106.233,81.345 U1.8@106.233,81.727
VBUS: C1.1 J2.A9 J2.B9 U1.1 | length 8.7
  Top Layer w0.5: 108.162,81.187 109.5,79.85 C1.1 ; C1.1@109.5,79.75 109.95,79.3 109.95,78.55 J2.B9 110.25,78.25 110.25,77.55 110.8,77 112.657,77 112.95,77.293 112.95,78.25 J2.A9
VCC: C3.1 C10.1 U1.10 U3.1 U3.2 U3.10 | length 42.4
  Top Layer w0.3: U3.10 U3.10@102.371,112.4 ; U3.10@102.4,112.371 102.4,112 102.6,111.8 104.1,111.8 104.399,112.099 104.399,112.371 U3.1 U3.2
  Top Layer w0.5: v1(102.3,110.1) C10.1 102.3,112.2 ; C3.1 105.78,79.78 105.855,79.78 107.2,81.125 U1.10
  Bottom Layer w0.5: v1(102.3,110.1) 98.4,106.2 98.4,88.7 v1(106.6,80.5)
VDD: C2.1 R4.1 U1.4 | length 8.2
  Top Layer w0.3: U1.4 108.162,84.263 C2.1 108.225,84.8 v1(108.9,84.8) ; R4.1 110.875,81.35 111.175,81.65 v1(111.19,81.65)
  Bottom Layer w0.3: v1(108.9,84.8) 111.19,82.51 v1(111.19,81.65)
pads on no net: FD1.0 FD2.0 FD3.0 J1.P1 J1.P2 J2.SH1 J2.SH2 J2.SH3 J2.SH4 J3.13 J4.1 J4.4 J4.19 U2.A2 U2.A3 U2.A4 U2.B1 U2.B3 U2.B9 U2.C1 U2.C2 U2.C5 U2.C6 U2.C8 U2.C9 U2.D1 U2.D2 U2.D3 U2.D7 U2.D9 U2.E1 U2.E2 U2.E3 U2.E7 U2.F1 U2.F2 U2.F3 U2.F7 U2.G1 U2.G2 U2.G3 U2.G4 U2.G5 U2.G7 U2.G8 U2.H1 U2.H3 U2.H7 U2.H8 U2.J1 U2.J4 U2.J5 U2.J7 U2.J8 U2.K1 U2.K9 U4.5

## Polygon pours and split planes (outlines as drawn)
GND on Bottom Layer "GND" (solid, pour order 10): 94,73.5 94,118 122,118 122,73.5
GND on Top Layer "GND" (solid, remove dead copper, pour order 7): 94,73.5 94,118 122,118 122,73.5

## Other copper
Top Layer:
  pour cut-out: 101.3,93.8 102.5,93.8 102.5,89 101.3,89
  pour cut-out: 99.55,113.65 99.55,113.15 99.6,113.1 101.2,113.1 101.2,113.7
  pour cut-out: 121.1,105.687 121.113,105.7 121.8,105.7 121.8,99.5 121.74,99.46 121.215,99.46
  pour cut-out: 111.96,94.87 114.5,94.87 114.5,93.6 111.96,93.6

## Silkscreen, mask and mechanical layers (free items; w line width, h text height)
Top Overlay:
  drawing of 10 lines, arcs and shapes, not listed
  text "Proto v0.1" at 96.346,98.354 h1 r90
  text "Made by" at 97.813,98.354 h1 r90
Mechanical 1:
  the board outline again, w0.254

## Text inside footprints (layer, text, board x,y; h text height)
U2: Top Component Center "RF KEEP-OUT" at 119,104.65 h0.38 r270